# Altium PCB PWR Board 10A.PcbDoc (part 9 of 10)
Units mm, origin at the board's own origin, x right, y up, seen from the top; angles counter-clockwise.
Board outline 355 x 325 mm, 4 copper layers (Top Layer, Layer 1, Layer 2, Bottom Layer), stack 1.636 mm thick; 617 components, 308 nets, 1518 pads, 1199 vias.
Unrouted connection lines stored in the file: 361.
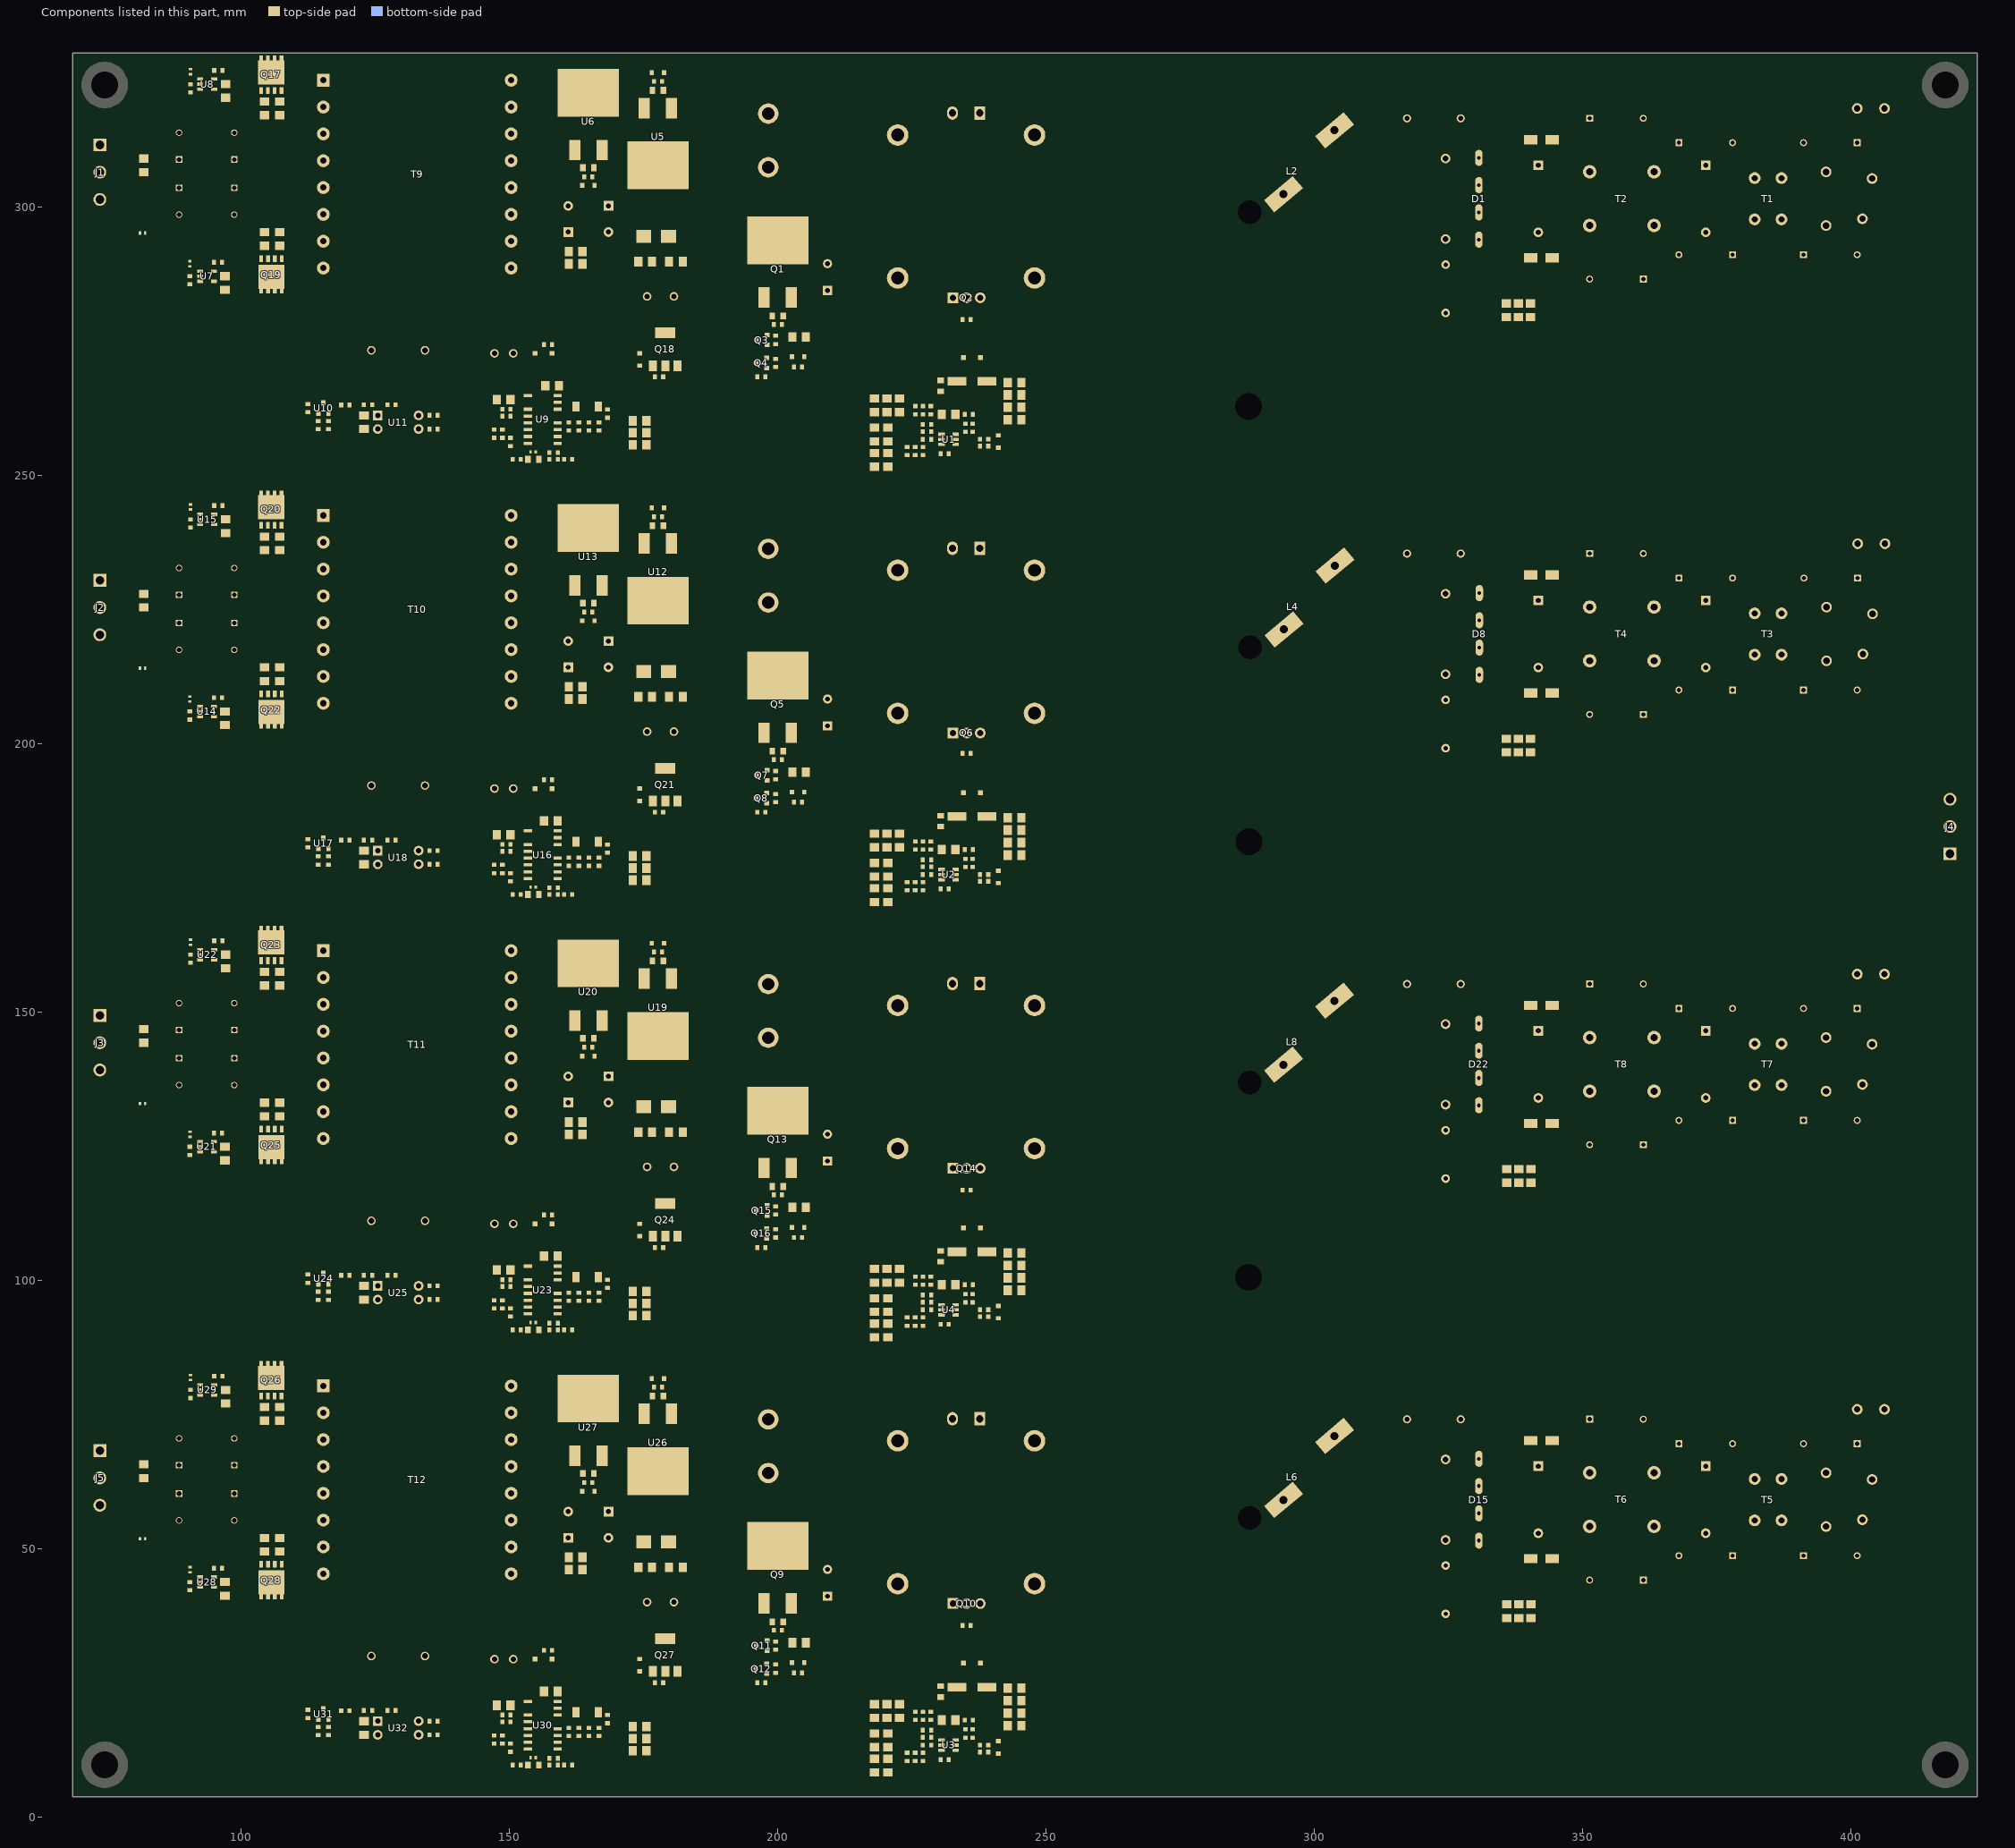
[diagram p7: the components of this part, seen from the top]

## Other copper
Top Layer:
  rectangle net NetD29_2: 178.105,314.757 181.304,325.781
  rectangle net H_V-C1: 207.442,301.523 219.202,325.781
  rectangle net VD-C1: 225.298,313.182 234.823,325.781
  rectangle net VD-C1: 225.298,319.557 269.164,325.781
  rectangle net NetD35_2: 178.105,233.654 181.304,244.678
  rectangle net H_V-C2: 207.442,220.421 219.202,244.678
  rectangle net VD-C2: 225.298,232.08 234.823,244.678
  rectangle net VD-C2: 225.298,238.455 269.164,244.678
  rectangle net NetD47_2: 178.105,71.45 181.304,82.474
  rectangle net H_V-C4: 207.442,58.216 219.202,82.474
  rectangle net VD-C4: 225.298,69.875 234.823,82.474
  rectangle net VD-C4: 225.298,76.25 269.164,82.474
  rectangle net VD-C3: 225.298,157.353 269.164,163.576
  rectangle net VD-C3: 225.298,150.978 234.823,163.576
  region net NetD48_1: 177.668,53.924 170.84,53.924 170.84,49.072 177.668,49.072
  rectangle net SGND-C4: 86.856,69.886 90.145,71.086
  rectangle net SGND-C4: 97.128,69.886 100.417,71.086
  rectangle net SGND-C4: 81.915,41.757 82.372,57.734
  region net PGND-C4: 81.432,57.734 80.975,57.734 80.975,41.757 81.432,41.757
  rectangle net SGND-C1: 81.915,285.064 82.372,301.041
  region net PGND-C1: 81.432,301.041 80.975,301.041 80.975,285.064 81.432,285.064
  rectangle net SGND-C2: 81.915,203.962 82.372,219.939
  region net PGND-C2: 81.432,219.939 80.975,219.939 80.975,203.962 81.432,203.962
  region net PGND-C3: 81.432,138.836 80.975,138.836 80.975,122.86 81.432,122.86
  rectangle net SGND-C3: 81.915,122.86 82.372,138.836
  rectangle net NetC63_1: 204.216,22.758 212.344,33.322
  rectangle net NetC86_1: 204.216,103.86 212.344,114.424
  rectangle net NetC40_1: 204.216,184.963 212.344,195.527
  rectangle net H_V-C4: 207.442,58.216 245.186,67.487
  rectangle net H_V-C4: 235.661,58.216 245.186,75.539
  rectangle net VD-C3: 225.298,150.978 234.823,163.576
  rectangle net H_V-C3: 207.442,139.319 245.186,148.59
  rectangle net H_V-C3: 235.661,139.319 245.186,156.642
  rectangle net H_V-C2: 207.442,220.421 245.186,229.692
  rectangle net H_V-C2: 235.661,220.421 245.186,237.744
  rectangle net NetC6_1: 385.47,303.301 405.689,309.18
  rectangle net NetC6_1: 397.764,303.403 403.28,319.913
  rectangle net VCC-C4: 157.513,28.919 162.204,31.517
  rectangle net VCC-C3: 157.513,110.021 162.204,112.619
  rectangle net VCC-C2: 157.513,191.13 162.204,193.728
  rectangle net GND: 232.579,254.431 237.016,256.019
  rectangle net GND: 231.268,253.4 232.598,255.144
  rectangle net GND: 232.579,173.329 237.016,174.917
  rectangle net GND: 231.268,172.298 232.598,174.041
  rectangle net GND: 232.579,92.226 237.016,93.814
  rectangle net GND: 231.268,91.196 232.598,92.939
  rectangle net GND: 231.268,10.093 232.598,11.837
  rectangle net GND: 232.579,11.124 237.016,12.712
  rectangle net NetR209_2: 335.026,33.486 336.804,37.79
  rectangle net NetR119_2: 334.924,275.89 336.702,280.194
  rectangle net NetR149_2: 334.924,194.788 336.702,199.092
  rectangle net AC_N: 385.089,51.385 423.266,59.983
  rectangle net AC_N: 385.089,132.487 423.266,141.085
  rectangle net AC_N: 385.089,212.687 423.266,221.285
  rectangle net AC_N: 385.089,293.789 423.266,302.387
  rectangle net GND: 142.977,229.082 152.045,234.061
  rectangle net GND: 142.977,226.161 148.692,234.061
  rectangle net NetD50_1: 173.858,22.758 177.559,28.081
  region net VCC-C4: 193.675,28.081 180.607,28.081 180.607,24.53 193.675,24.53
  rectangle net VCC-C4: 180.607,22.758 196.624,26.638
  rectangle net NetD44_1: 173.858,103.86 177.559,109.183
  region net VCC-C3: 193.675,109.183 180.607,109.183 180.607,105.633 193.675,105.633
  rectangle net VCC-C3: 180.607,103.86 196.624,107.74
  rectangle net NetD38_1: 173.858,184.963 177.559,190.286
  region net VCC-C2: 193.675,190.286 180.607,190.286 180.607,186.735 193.675,186.735
  rectangle net VCC-C2: 180.607,184.963 196.624,188.842
  rectangle net VD-C4: 216.179,14.503 222.453,17.081
  rectangle net VD-C3: 216.179,95.605 222.453,98.183
  rectangle net VD-C2: 216.179,176.708 222.453,179.285
  rectangle net NetD19_2: 238.732,12.907 241.589,16.072
  rectangle net NetD19_1: 238.732,11.357 241.589,12.501
  rectangle net NetD26_2: 238.732,94.01 241.589,97.175
  rectangle net NetD26_1: 238.732,92.46 241.589,93.603
  rectangle net NetD12_2: 238.732,175.112 241.589,178.277
  rectangle net NetD12_1: 238.732,173.562 241.589,174.706
  rectangle net H_V-C1: 235.661,301.523 245.186,318.846
  rectangle net H_V-C1: 207.442,301.523 245.186,310.794
  rectangle net NetD30_2: 178.285,292.379 192.659,297.231
  rectangle net NetD30_2: 181.575,288.881 192.659,297.231
  rectangle net NetD36_2: 178.285,211.277 192.659,216.128
  rectangle net NetD36_2: 181.575,207.779 192.659,216.128
  rectangle net NetD42_2: 178.285,130.175 192.659,135.026
  rectangle net NetD42_2: 181.575,126.677 192.659,135.026
  rectangle net NetC4_2: 320.65,287.971 333.019,295.439
  rectangle net NetC2_2: 361.036,293.815 384.073,300.978
  rectangle net NetC2_2: 361.036,289.597 370.764,300.952
  rectangle net NetC7_1: 361.036,302.018 384.073,309.18
  rectangle net NetC7_1: 361.036,302.043 370.764,313.398
  rectangle net VD_R1-C1: 101.194,279.629 121.666,289.428
  rectangle net VD_R1-C2: 101.194,198.527 121.666,208.325
  rectangle net VD_R1-C3: 101.194,117.424 121.666,127.223
  rectangle net GND: 142.977,66.878 152.045,71.856
  rectangle net GND: 142.977,63.957 148.692,71.856
  rectangle net GND: 142.977,147.98 152.045,152.959
  rectangle net GND: 142.977,145.059 148.692,152.959
  rectangle net GND: 142.977,307.264 148.692,315.163
  rectangle net GND: 142.977,310.185 152.045,315.163
  rectangle net NetR144_2: 94.481,242.389 95.581,244.749
  rectangle net RVCC-C4: 236.804,27.533 240.787,29.667
  rectangle net RVCC-C3: 236.804,108.636 240.787,110.769
  rectangle net RVCC-C2: 236.804,189.738 240.787,191.871
  rectangle net H_V-C4: 174.803,15.915 176.327,21.971
  region net H_V-C4: 218.98,21.971 174.803,21.971 174.803,20.205 218.98,20.205
  region net RVCC-C4: 170.231,23.26 168.504,23.26 168.504,22.498 170.231,22.498
  region net RVCC-C4: 169.469,23.26 169.469,16.11 170.231,16.11 170.231,23.26
  rectangle net RVCC-C4: 158.261,16.11 170.231,16.872
  rectangle net RVCC-C4: 167.881,16.11 168.77,17.761
  region net NetR209_2: 155.482,17.556 155.482,21.795 154.882,21.795 154.882,17.556
  rectangle net NetR209_2: 152.711,21.195 155.482,21.795
  rectangle net NetD51_2: 165.974,18.513 168.77,20.413
  rectangle net VCC-C4: 157.513,28.919 158.463,31.517
  rectangle net NetR211_1: 172.263,13.667 173.787,17.693
  rectangle net NetR212_1: 174.803,11.419 176.327,15.445
  rectangle net HB-C4: 155.972,18.655 163.154,19.465
  rectangle net HB-C4: 155.972,18.655 157.496,24.233
  rectangle net HS-C4: 158.261,21.195 160.036,27.076
  rectangle net NetC229_2: 158.261,8.998 160.604,10.261
  rectangle net NetC229_2: 158.261,8.998 159.811,12.905
  rectangle net BW-C4: 151.765,8.998 154.261,10.268
  rectangle net BW-C4: 152.711,8.998 154.261,12.905
  rectangle net NetC223_1: 149.475,28.524 155.372,30.169
  rectangle net NetC223_1: 149.475,19.869 150.999,30.169
  rectangle net H_V-C3: 174.803,97.017 176.327,103.073
  region net H_V-C3: 218.98,103.073 174.803,103.073 174.803,101.307 218.98,101.307
  region net RVCC-C3: 170.231,104.362 168.504,104.362 168.504,103.6 170.231,103.6
  region net RVCC-C3: 169.469,104.362 169.469,97.213 170.231,97.213 170.231,104.362
  rectangle net RVCC-C3: 158.261,97.213 170.231,97.975
  rectangle net RVCC-C3: 167.881,97.213 168.77,98.864
  region net NetR179_2: 155.482,98.658 155.482,102.897 154.882,102.897 154.882,98.658
  rectangle net NetR179_2: 152.711,102.297 155.482,102.897
  rectangle net NetD45_2: 165.974,99.615 168.77,101.515
  rectangle net VCC-C3: 157.513,110.021 158.463,112.619
  rectangle net NetR181_1: 172.263,94.769 173.787,98.795
  rectangle net NetR182_1: 174.803,92.521 176.327,96.547
  rectangle net HB-C3: 155.972,99.757 163.154,100.567
  rectangle net HB-C3: 155.972,99.757 157.496,105.335
  rectangle net HS-C3: 158.261,102.297 160.036,108.178
  rectangle net NetC194_2: 158.261,90.101 160.604,91.364
  rectangle net NetC194_2: 158.261,90.101 159.811,94.007
  rectangle net BW-C3: 151.765,90.101 154.261,91.371
  rectangle net BW-C3: 152.711,90.101 154.261,94.007
  rectangle net NetC188_1: 149.475,109.626 155.372,111.271
  rectangle net NetC188_1: 149.475,100.972 150.999,111.271
  rectangle net NetC153_1: 149.475,182.074 150.999,192.374
  rectangle net NetC153_1: 149.475,190.728 155.372,192.374
  rectangle net BW-C2: 152.711,171.203 154.261,175.11
  rectangle net BW-C2: 151.765,171.203 154.261,172.473
  rectangle net NetC159_2: 158.261,171.203 159.811,175.11
  rectangle net NetC159_2: 158.261,171.203 160.604,172.466
  rectangle net HS-C2: 158.261,183.4 160.036,189.281
  rectangle net HB-C2: 155.972,180.86 157.496,186.437
  rectangle net HB-C2: 155.972,180.86 163.154,181.67
  rectangle net NetR152_1: 174.803,173.624 176.327,177.65
  rectangle net NetR151_1: 172.263,175.872 173.787,179.897
  rectangle net VCC-C2: 157.513,191.124 158.463,193.722
  rectangle net NetD39_2: 165.974,180.718 168.77,182.618
  rectangle net NetR149_2: 152.711,183.4 155.482,184
  region net NetR149_2: 155.482,179.76 155.482,184 154.882,184 154.882,179.76
  rectangle net RVCC-C2: 167.881,178.315 168.77,179.966
  rectangle net RVCC-C2: 158.261,178.315 170.231,179.077
  region net RVCC-C2: 169.469,185.465 169.469,178.315 170.231,178.315 170.231,185.465
  region net RVCC-C2: 170.231,185.465 168.504,185.465 168.504,184.703 170.231,184.703
  region net H_V-C2: 218.98,184.175 174.803,184.175 174.803,182.409 218.98,182.409
  rectangle net H_V-C2: 174.803,178.119 176.327,184.175
  rectangle net 24VDC-C4: 94.423,40.429 95.523,43.081
  rectangle net 24VDC-C3: 94.425,121.546 95.525,124.198
  rectangle net 24VDC-C4: 94.425,28.194 97.917,41.967
  region net 24VDC-C4: 125.781,28.194 125.781,31.685 94.425,31.685 94.425,28.194
  rectangle net 24VDC-C3: 94.425,109.296 97.917,123.07
  region net 24VDC-C3: 125.781,109.296 125.781,112.788 94.425,112.788 94.425,109.296
  rectangle net 24VDC-C2: 94.425,190.398 97.917,204.172
  region net 24VDC-C2: 125.781,190.398 125.781,193.89 94.425,193.89 94.425,190.398
  rectangle net H_V-C1: 174.803,259.222 176.327,265.278
  region net 24VDC-C1: 125.781,271.501 125.781,274.992 94.425,274.992 94.425,271.501
  rectangle net 24VDC-C2: 94.425,202.648 97.917,204.172
  rectangle net 24VDC-C2: 94.425,202.648 95.525,205.3
  rectangle net 24VDC-C1: 94.425,283.75 95.525,286.402
  rectangle net 24VDC-C1: 94.425,283.75 97.917,285.274
  region net H_V-C1: 218.98,265.278 174.803,265.278 174.803,263.512 218.98,263.512
  region net RVCC-C1: 170.231,266.567 168.504,266.567 168.504,265.805 170.231,265.805
  rectangle net RVCC-C1: 236.804,270.84 240.787,272.974
  region net RVCC-C1: 169.469,266.567 169.469,259.417 170.231,259.417 170.231,266.567
  rectangle net RVCC-C1: 158.261,259.417 170.231,260.179
  rectangle net RVCC-C1: 167.881,259.417 168.77,261.068
  rectangle net NetR204_2: 94.481,80.184 95.581,82.544
  rectangle net 24VDC-C4: 94.481,72.186 98.019,77.756
  region net NetR221_2: 127.686,21.183 127.686,21.945 122.047,21.945 122.047,21.183
  rectangle net NetR221_2: 126.924,19.343 127.686,21.945
  rectangle net NetR221_2: 122.047,17.049 123.317,21.945
  rectangle net NetR221_2: 119.837,19.343 123.317,20.232
  rectangle net VD_R2-C4: 96.174,81.655 102.997,84.905
  rectangle net NetR204_2: 94.481,80.184 95.581,82.544
  rectangle net 24VDC-C4: 94.481,72.186 95.581,78.884
  rectangle net 24VDC-C4: 96.241,72.186 102.464,74.505
  region net SGND-C4: 108.712,77.125 98.328,77.125 98.328,75.057 108.712,75.057
  region net SGND-C4: 106.651,78.989 98.328,78.989 98.328,75.057 106.651,75.057
  rectangle net SGND-C4: 104.704,46.396 108.915,50.172
  rectangle net VD_R1-C4: 109.601,40.641 121.666,51.988
  rectangle net VD_R1-C4: 101.194,36.322 121.666,46.12
  rectangle net VD_R2-C4: 101.194,79.327 121.666,84.905
  rectangle net VD_R2-C4: 109.601,73.558 121.666,84.905
  rectangle net NetD48_2: 181.575,45.574 192.659,53.924
  rectangle net NetD48_2: 178.285,49.072 192.659,53.924
  region net LO-C4: 166.305,62.718 165.136,62.718 165.136,60.198 166.305,60.198
  rectangle net GND: 165.136,63.315 168.335,70.231
  region net NetD49_2: 164.374,70.231 161.175,70.231 161.175,60.198 164.374,60.198
  region net HS-C4: 177.343,79.001 159.04,79.001 159.04,71.45 177.343,71.45
  rectangle net HO-C4: 176.174,79.597 177.343,82.118
  rectangle net NetC63_1: 204.216,26.381 206.07,33.322
  rectangle net NetQ12_1: 197.386,24.53 203.454,27.27
  rectangle net NetQ11_1: 197.512,29.641 200.115,31.7
  rectangle net NetQ11_1: 194.337,29.641 200.115,31.112
  rectangle net NetQ11_1: 194.337,27.178 196.465,31.112
  rectangle net RVCC-C4: 200.713,29.641 203.53,33.322
  rectangle net NetC59_2: 194.337,31.464 196.774,44.018
  rectangle net NetQ11_1: 197.512,30.427 200.115,31.493
  rectangle net RVCC-C4: 197.512,32.122 203.53,33.322
  rectangle net NetC59_2: 194.337,34.326 199.671,44.018
  rectangle net NetC58_2: 194.337,44.627 212.344,56.819
  rectangle net NetC58_2: 194.337,44.627 205.767,70.078
  rectangle net NetR203_2: 94.425,44.395 95.525,46.755
  rectangle net GND: 225.251,19.163 228.996,21.971
  rectangle net NetC61_1: 223.713,7.213 227.549,10.781
  rectangle net NetD19_2: 230.734,34.671 234.861,36.626
  rectangle net NetD19_2: 230.734,34.671 233.702,41.148
  rectangle net DRV-C4: 237.38,11.632 238.142,13.817
  rectangle net DRV-C4: 232.579,13.042 238.142,13.662
  rectangle net NetC64_2: 232.579,14.363 236.8,15.125
  rectangle net NetC65_1: 235.911,15.887 236.8,18.465
  rectangle net NetC64_2: 232.579,13.992 233.799,15.125
  rectangle net ZCD/CS-C4: 228.247,10.019 230.762,11.328
  rectangle net ZCD/CS-C4: 227.866,10.019 229.413,13.796
  rectangle net ZCD/CS-C4: 228.247,13.042 231.179,13.662
  rectangle net NetC68_2: 227.866,14.35 231.179,15.125
  rectangle net NetC68_2: 229.959,13.943 231.179,15.125
  rectangle net NetC68_2: 227.866,14.35 229.194,18.401
  rectangle net NetC68_2: 225.251,17.005 229.194,18.401
  rectangle net NetR58_1: 223.063,14.35 224.663,19.189
  rectangle net NetR58_1: 221.825,17.381 224.663,19.189
  rectangle net NetR58_1: 223.063,14.35 227.485,16.56
  rectangle net NetC60_1: 219.666,11.543 227.549,13.735
  rectangle net NetR55_1: 219.513,20.205 223.603,21.971
  rectangle net NetR53_1: 216.179,17.381 221.291,19.189
  rectangle net NetR59_1: 216.179,7.213 222.467,9.519
  region net NetC60_1: 222.467,13.735 219.666,13.735 219.666,10.027 222.467,10.027
  rectangle net NetR56_1: 216.179,10.027 218.98,13.735
  rectangle net NetC66_2: 229.796,17.131 231.879,22.805
  rectangle net NetC67_1: 229.796,23.367 235.839,29.667
  rectangle net NetC90_1: 229.796,104.469 235.839,110.769
  rectangle net NetC89_2: 229.796,98.234 231.879,103.907
  rectangle net NetR82_1: 216.179,91.129 218.98,94.838
  region net NetC83_1: 222.467,94.838 219.666,94.838 219.666,91.129 222.467,91.129
  rectangle net NetR85_1: 216.179,88.316 222.467,90.621
  rectangle net NetR79_1: 216.179,98.484 221.291,100.291
  rectangle net NetR81_1: 219.513,101.307 223.603,103.073
  rectangle net NetC83_1: 219.666,92.646 227.549,94.838
  rectangle net NetR84_1: 223.063,95.452 227.485,97.662
  rectangle net NetR84_1: 221.825,98.484 224.663,100.291
  rectangle net NetR84_1: 223.063,95.452 224.663,100.291
  rectangle net NetC91_2: 225.251,98.108 229.194,99.504
  rectangle net NetC91_2: 227.866,95.452 229.194,99.504
  rectangle net NetC91_2: 229.959,95.045 231.179,96.227
  rectangle net NetC91_2: 227.866,95.452 231.179,96.227
  rectangle net ZCD/CS-C3: 228.247,94.144 231.179,94.764
  rectangle net ZCD/CS-C3: 227.866,91.122 229.413,94.899
  rectangle net ZCD/CS-C3: 228.247,91.122 230.762,92.43
  rectangle net NetC87_2: 232.579,95.094 233.799,96.227
  rectangle net NetC88_1: 235.911,96.989 236.8,99.567
  rectangle net NetC87_2: 232.579,95.465 236.8,96.227
  rectangle net DRV-C3: 232.579,94.144 238.142,94.764
  rectangle net DRV-C3: 237.38,92.734 238.142,94.919
  rectangle net NetD26_2: 230.734,115.773 233.702,122.25
  rectangle net NetD26_2: 230.734,115.773 234.861,117.729
  rectangle net NetC84_1: 223.713,88.316 227.549,91.884
  rectangle net GND: 225.251,100.266 228.996,103.073
  rectangle net NetC44_1: 229.796,185.572 235.839,191.871
  rectangle net NetC43_2: 229.796,179.336 231.879,185.009
  rectangle net NetR30_1: 216.179,172.232 218.98,175.94
  region net NetC37_1: 222.467,175.94 219.666,175.94 219.666,172.232 222.467,172.232
  rectangle net NetR33_1: 216.179,169.418 222.467,171.724
  rectangle net NetR27_1: 216.179,179.586 221.291,181.393
  rectangle net NetR29_1: 219.513,182.409 223.603,184.175
  rectangle net NetC37_1: 219.666,173.748 227.549,175.94
  rectangle net NetR32_1: 223.063,176.555 227.485,178.764
  rectangle net NetR32_1: 221.825,179.586 224.663,181.393
  rectangle net NetR32_1: 223.063,176.555 224.663,181.393
  rectangle net NetC45_2: 225.251,179.21 229.194,180.606
  rectangle net NetC45_2: 227.866,176.555 229.194,180.606
  rectangle net NetC45_2: 229.959,176.148 231.179,177.329
  rectangle net NetC45_2: 227.866,176.555 231.179,177.329
  rectangle net ZCD/CS-C2: 228.247,175.247 231.179,175.867
  rectangle net ZCD/CS-C2: 227.866,172.224 229.413,176.001
  rectangle net ZCD/CS-C2: 228.247,172.224 230.762,173.533
  rectangle net NetC41_2: 232.579,176.197 233.799,177.329
  rectangle net NetC42_1: 235.911,178.091 236.8,180.669
  rectangle net NetC41_2: 232.579,176.567 236.8,177.329
  rectangle net DRV-C2: 232.579,175.247 238.142,175.867
  rectangle net DRV-C2: 237.38,173.837 238.142,176.021
  rectangle net NetD12_2: 230.734,196.875 233.702,203.352
  rectangle net NetD12_2: 230.734,196.875 234.861,198.831
  rectangle net NetC38_1: 223.713,169.418 227.549,172.986
  rectangle net GND: 225.251,181.368 228.996,184.175
  rectangle net NetR208_2: 335.001,38.806 339.026,40.33
  rectangle net NetR207_2: 337.248,36.266 341.274,37.79
  rectangle net HV_S-C4: 339.496,38.806 341.274,43.448
  rectangle net HV_S-C4: 335.519,67.577 342.123,76.188
  rectangle net HV_S-C4: 335.519,41.999 342.123,50.584
  rectangle net NetR179_2: 335.026,114.588 336.804,118.893
  rectangle net HV_S-C3: 335.519,123.101 342.123,131.686
  rectangle net HV_S-C3: 335.519,148.679 342.123,157.29
  rectangle net HV_S-C3: 339.496,119.909 341.274,124.55
  rectangle net NetR177_2: 337.259,117.368 341.285,118.892
  rectangle net NetR178_2: 335.011,119.908 339.037,121.432
  rectangle net NetR173_2: 94.425,125.498 95.525,127.858
  rectangle net H_V-C3: 207.442,139.319 219.202,163.576
  rectangle net NetC81_2: 194.337,125.73 205.767,151.181
  rectangle net NetC81_2: 194.337,125.73 212.344,137.922
  rectangle net NetC82_2: 194.337,115.428 199.671,125.12
  rectangle net RVCC-C3: 197.512,113.224 203.53,114.424
  rectangle net NetQ15_1: 197.512,111.529 200.115,112.596
  rectangle net NetC82_2: 194.337,112.567 196.774,125.12
  rectangle net RVCC-C3: 200.713,110.744 203.53,114.424
  rectangle net NetQ15_1: 194.337,108.28 196.465,112.215
  rectangle net NetQ15_1: 194.337,110.744 200.115,112.215
  rectangle net NetQ15_1: 197.512,110.744 200.115,112.802
  rectangle net NetQ16_1: 197.386,105.633 203.454,108.372
  rectangle net NetC86_1: 204.216,107.483 206.07,114.424
  rectangle net NetD41_2: 178.105,152.552 181.304,163.576
  rectangle net HO-C3: 176.174,160.7 177.343,163.22
  rectangle net HS-C3: 159.04,152.552 174.828,163.576
  region net HS-C3: 177.343,160.103 159.04,160.103 159.04,152.552 177.343,152.552
  region net NetD43_2: 164.374,151.333 161.175,151.333 161.175,141.3 164.374,141.3
  rectangle net GND: 165.136,144.417 168.335,151.333
  region net LO-C3: 166.305,143.821 165.136,143.821 165.136,141.3 166.305,141.3
  region net NetD42_1: 177.668,135.026 170.84,135.026 170.84,130.175 177.668,130.175
  rectangle net VD_R2-C3: 109.601,154.66 121.666,166.007
  rectangle net VD_R2-C3: 101.194,160.429 121.666,166.007
  rectangle net VD_R1-C3: 109.601,121.744 121.666,133.09
  rectangle net SGND-C3: 104.704,127.498 108.915,131.274
  region net SGND-C3: 106.651,160.142 98.328,160.142 98.328,156.159 106.651,156.159
  region net SGND-C3: 108.712,158.228 98.328,158.228 98.328,156.159 108.712,156.159
  rectangle net 24VDC-C3: 96.241,153.289 102.464,155.607
  rectangle net 24VDC-C3: 94.481,153.289 95.581,159.986
  rectangle net NetR174_2: 94.481,161.286 95.581,163.646
  rectangle net VD_R2-C3: 96.174,162.757 102.997,166.007
  rectangle net NetR191_2: 119.837,100.446 123.317,101.335
  rectangle net NetR191_2: 122.047,98.152 123.317,103.047
  rectangle net NetR191_2: 126.924,100.446 127.686,103.047
  region net NetR191_2: 127.686,102.285 127.686,103.047 122.047,103.047 122.047,102.285
  rectangle net 24VDC-C3: 94.481,153.289 98.019,158.858
  rectangle net SGND-C3: 86.856,150.988 90.145,152.188
  rectangle net SGND-C3: 97.128,150.988 100.417,152.188
  rectangle net NetC25_2: 361.123,212.687 384.16,219.849
  rectangle net NetC30_1: 361.123,220.915 384.16,228.077
  rectangle net NetC31_1: 336.84,220.801 353.909,227.863
  rectangle net NetC31_1: 342.657,220.801 353.909,237.489
  rectangle net NetC31_1: 329.601,220.801 353.909,225.069
  rectangle net NetC26_2: 336.84,212.927 353.909,219.988
  rectangle net NetC26_2: 342.657,203.3 353.909,219.988
  rectangle net NetC26_2: 329.601,215.721 353.909,219.988
  rectangle net NetC25_2: 361.123,208.494 370.851,219.849
  rectangle net NetC30_1: 361.123,220.94 370.851,232.295
  rectangle net NetC27_2: 320.737,206.868 333.106,214.336
  rectangle net NetC28_2: 309.23,197.967 326.934,205.892
  rectangle net NetC28_2: 308.443,197.967 319.289,237.515
  rectangle net NetC28_2: 298.308,225.475 319.289,237.515
  rectangle net NetR148_2: 335.011,200.107 339.037,201.631
  rectangle net NetR147_2: 337.259,197.567 341.285,199.091
  rectangle net HV_S-C2: 335.519,228.879 342.123,237.489
  rectangle net HV_S-C2: 335.519,203.3 342.123,211.885
  rectangle net HV_S-C2: 339.507,200.107 341.285,204.749
  rectangle net NetC35_2: 194.337,206.832 205.767,232.283
  rectangle net NetC35_2: 194.337,206.832 212.344,219.024
  rectangle net NetC36_2: 194.337,196.53 199.671,206.222
  rectangle net RVCC-C2: 197.512,194.326 203.53,195.527
  rectangle net NetQ7_1: 197.512,192.631 200.115,193.698
  rectangle net NetC36_2: 194.337,193.669 196.774,206.222
  rectangle net RVCC-C2: 200.713,191.846 203.53,195.527
  rectangle net NetQ7_1: 194.337,189.382 196.465,193.317
  rectangle net NetQ7_1: 194.337,191.846 200.115,193.317
  rectangle net NetQ7_1: 197.512,191.846 200.115,193.904
  rectangle net NetQ8_1: 197.386,186.735 203.454,189.475
  rectangle net NetC40_1: 204.216,188.586 206.07,195.527
  rectangle net HO-C2: 176.174,241.802 177.343,244.322
  region net HS-C2: 177.343,241.205 159.04,241.205 159.04,233.654 177.343,233.654
  region net NetD37_2: 164.374,232.435 161.175,232.435 161.175,222.403 164.374,222.403
  rectangle net GND: 165.136,225.52 168.335,232.435
  region net LO-C2: 166.305,224.923 165.136,224.923 165.136,222.403 166.305,222.403
  region net NetD36_1: 177.668,216.128 170.84,216.128 170.84,211.277 177.668,211.277
  rectangle net VD_R2-C2: 109.601,235.763 121.666,247.109
  rectangle net VD_R2-C2: 101.194,241.531 121.666,247.109
  rectangle net VD_R1-C2: 109.601,202.846 121.666,214.193
  rectangle net SGND-C2: 104.704,208.601 108.915,212.376
  region net SGND-C2: 106.651,241.244 98.328,241.244 98.328,237.268 106.651,237.268
  region net SGND-C2: 108.712,239.33 98.328,239.33 98.328,237.261 108.712,237.261
  rectangle net 24VDC-C2: 96.241,234.391 102.464,236.709
  rectangle net 24VDC-C2: 94.481,234.391 95.581,241.089
  rectangle net VD_R2-C2: 96.174,243.86 102.997,247.109
  rectangle net NetR143_2: 94.425,206.6 95.525,208.96
  rectangle net NetR161_2: 119.837,181.548 123.317,182.437
  rectangle net NetR161_2: 122.047,179.254 123.317,184.15
  rectangle net NetR161_2: 126.924,181.548 127.686,184.15
  region net NetR161_2: 127.686,183.388 127.686,184.15 122.047,184.15 122.047,183.388
  rectangle net 24VDC-C2: 94.481,234.391 98.019,239.961
  rectangle net SGND-C2: 86.856,232.09 90.145,233.29
  rectangle net SGND-C2: 97.128,232.09 100.417,233.29
  region net NetR119_2: 155.482,260.863 155.482,265.102 154.882,265.102 154.882,260.863
  rectangle net NetR119_2: 152.711,264.502 155.482,265.102
  rectangle net NetD33_2: 165.974,261.82 168.77,263.72
  rectangle net HV_S-C1: 339.42,281.21 341.198,285.852
  rectangle net HV_S-C1: 335.432,284.403 342.036,292.988
  rectangle net HV_S-C1: 335.432,309.982 342.036,318.592
  rectangle net SGND-C1: 97.128,313.193 100.417,314.393
  rectangle net SGND-C1: 86.856,313.193 90.145,314.393
  rectangle net 24VDC-C1: 94.481,315.493 98.019,321.063
  rectangle net 24VDC-C1: 94.425,271.501 97.917,285.274
  rectangle net VCC-C1: 157.513,272.226 162.204,274.824
  region net NetR131_2: 127.686,264.49 127.686,265.252 122.047,265.252 122.047,264.49
  rectangle net NetR131_2: 126.924,262.651 127.686,265.252
  rectangle net NetR131_2: 122.047,260.357 123.317,265.252
  rectangle net NetR131_2: 119.837,262.651 123.317,263.54
  rectangle net NetR121_1: 172.263,256.974 173.787,261
  rectangle net NetR122_1: 174.803,254.726 176.327,258.752
  rectangle net HB-C1: 155.972,261.962 163.154,262.772
  rectangle net HB-C1: 155.972,261.962 157.496,267.54
  rectangle net HS-C1: 158.261,264.502 160.036,270.383
  rectangle net NetC124_2: 158.261,252.305 160.604,253.568
  rectangle net NetC124_2: 158.261,252.305 159.811,256.212
  rectangle net BW-C1: 151.765,252.305 154.261,253.575
  rectangle net BW-C1: 152.711,252.305 154.261,256.212
  rectangle net NetC118_1: 149.475,271.831 155.372,273.476
  rectangle net NetC118_1: 149.475,263.176 150.999,273.476
  rectangle net NetR117_2: 337.172,278.67 341.198,280.194
  rectangle net NetR118_2: 334.924,281.21 338.95,282.734
  rectangle net NetR204_2: 94.481,80.184 95.581,82.544
  rectangle net NetR174_2: 94.481,161.286 95.581,163.646
  rectangle net NetR144_2: 94.481,242.389 95.581,244.749
  rectangle net NetR113_2: 94.425,287.702 95.525,290.062
  rectangle net VD_R2-C1: 96.174,324.962 102.997,328.212
  rectangle net NetR114_2: 94.481,323.491 95.581,325.851
  rectangle net 24VDC-C1: 94.481,315.493 95.581,322.191
  rectangle net 24VDC-C1: 96.241,315.493 102.464,317.812
  region net SGND-C1: 108.712,320.432 98.328,320.432 98.328,318.364 108.712,318.364
  region net SGND-C1: 106.651,322.296 98.328,322.296 98.328,318.364 106.651,318.364
  rectangle net SGND-C1: 104.704,289.703 108.915,293.479
  rectangle net VD_R1-C1: 109.601,283.948 121.666,295.295
  rectangle net VD_R2-C1: 101.194,322.634 121.666,328.212
  rectangle net VD_R2-C1: 109.601,316.865 121.666,328.212
  region net NetD30_1: 177.668,297.231 170.84,297.231 170.84,292.379 177.668,292.379
  rectangle net VCC-C1: 180.607,266.065 196.624,269.945
  region net VCC-C1: 193.675,271.388 180.607,271.388 180.607,267.837 193.675,267.837
  rectangle net NetD32_1: 173.858,266.065 177.559,271.388
  region net LO-C1: 166.305,306.025 165.136,306.025 165.136,303.505 166.305,303.505
  rectangle net GND: 165.136,306.622 168.335,313.538
  region net NetD31_2: 164.374,313.538 161.175,313.538 161.175,303.505 164.374,303.505
  region net HS-C1: 177.343,322.308 159.04,322.308 159.04,314.757 177.343,314.757
  rectangle net HO-C1: 176.174,322.905 177.343,325.425
  rectangle net NetC17_1: 204.216,266.065 212.344,276.629
  rectangle net NetQ4_1: 197.386,266.065 203.454,270.577
  rectangle net NetQ3_1: 197.512,272.948 200.115,275.007
  rectangle net NetQ3_1: 194.337,272.948 200.115,274.419
  rectangle net NetQ3_1: 194.337,270.485 196.465,274.419
  rectangle net RVCC-C1: 200.713,272.948 203.53,276.629
  rectangle net NetC13_2: 194.337,274.771 196.774,287.325
  rectangle net NetQ3_1: 197.512,273.734 200.115,274.8
  rectangle net RVCC-C1: 197.512,275.429 203.53,276.629
  rectangle net NetC13_2: 194.337,277.633 199.671,287.325
  rectangle net NetC12_2: 194.337,287.934 212.344,300.126
  rectangle net NetC12_2: 194.337,287.934 205.767,313.385
  rectangle net GND: 225.251,262.47 228.996,265.278
  rectangle net NetC15_1: 223.713,250.52 227.549,254.088
  rectangle net NetD5_2: 230.734,277.978 234.861,279.933
  rectangle net NetD5_2: 230.734,277.978 233.702,284.455
  rectangle net DRV-C1: 237.38,254.939 238.142,257.124
  rectangle net DRV-C1: 232.579,256.349 238.142,256.969
  rectangle net NetD5_1: 238.732,254.685 241.589,255.828
  rectangle net NetD5_2: 238.732,256.235 241.589,259.4
  rectangle net NetC18_2: 232.579,257.67 236.8,258.432
  rectangle net NetC19_1: 235.911,259.194 236.8,261.772
  rectangle net NetC18_2: 232.579,257.299 233.799,258.432
  rectangle net ZCD/CS-C1: 228.247,253.326 230.762,254.635
  rectangle net ZCD/CS-C1: 227.866,253.326 229.413,257.103
  rectangle net ZCD/CS-C1: 228.247,256.349 231.179,256.969
  rectangle net NetC22_2: 227.866,257.657 231.179,258.432
  rectangle net NetC22_2: 229.959,257.25 231.179,258.432
  rectangle net NetC22_2: 227.866,257.657 229.194,261.708
  rectangle net NetC22_2: 225.251,260.312 229.194,261.708
  rectangle net NetR6_1: 223.063,257.657 224.663,262.496
  rectangle net NetR6_1: 221.825,260.688 224.663,262.496
  rectangle net NetR6_1: 223.063,257.657 227.485,259.867
  rectangle net NetC14_1: 219.666,254.85 227.549,257.043
  rectangle net NetR3_1: 219.513,263.512 223.603,265.278
  rectangle net NetR1_1: 216.179,260.688 221.291,262.496
  rectangle net NetR7_1: 216.179,250.52 222.467,252.826
  region net NetC14_1: 222.467,257.043 219.666,257.043 219.666,253.334 222.467,253.334
  rectangle net NetR4_1: 216.179,253.334 218.98,257.043
  rectangle net NetC20_2: 229.796,260.438 231.879,266.112
  rectangle net NetC21_1: 229.796,266.674 235.839,272.974
  rectangle net VD-C1: 216.179,257.81 222.453,260.388
  rectangle net NetC5_2: 298.221,306.578 319.202,318.618
  rectangle net NetC5_2: 308.356,279.07 319.202,318.618
  rectangle net NetC5_2: 309.143,279.07 326.847,286.995
  rectangle net NetC74_2: 298.221,144.374 319.202,156.413
  rectangle net NetC74_2: 308.356,116.866 319.202,156.413
  rectangle net NetC74_2: 309.143,116.866 326.847,124.79
  rectangle net NetC51_2: 309.143,35.763 326.847,43.688
  rectangle net NetC51_2: 308.356,35.763 319.202,75.311
  rectangle net NetC51_2: 298.221,63.271 319.202,75.311
  rectangle net NetC50_2: 320.65,45.567 333.019,53.035
  rectangle net NetC73_2: 320.65,126.67 333.019,134.137
  rectangle net NetC76_1: 361.036,140.741 370.764,152.097
  rectangle net NetC71_2: 361.036,128.296 370.764,139.651
  rectangle net NetC53_1: 361.036,59.639 370.764,70.994
  rectangle net NetC48_2: 361.036,47.193 370.764,58.548
  rectangle net NetC3_2: 329.514,296.824 353.822,301.091
  rectangle net NetC3_2: 342.57,284.403 353.822,301.091
  rectangle net NetC3_2: 336.753,294.03 353.822,301.091
  rectangle net NetC49_2: 329.514,54.42 353.822,58.687
  rectangle net NetC49_2: 342.57,41.999 353.822,58.687
  rectangle net NetC49_2: 336.753,51.626 353.822,58.687
  rectangle net NetC72_2: 329.514,135.522 353.822,139.789
  rectangle net NetC72_2: 342.57,123.102 353.822,139.789
  rectangle net NetC72_2: 336.753,132.728 353.822,139.789
  rectangle net NetC54_1: 336.753,59.5 353.822,66.562
  rectangle net NetC54_1: 342.57,59.5 353.822,76.188
  rectangle net NetC54_1: 329.514,59.5 353.822,63.768
  rectangle net NetC77_1: 336.753,140.603 353.822,147.664
  rectangle net NetC77_1: 342.57,140.603 353.822,157.291
  rectangle net NetC77_1: 329.514,140.603 353.822,144.87
  rectangle net NetC8_1: 329.514,301.904 353.822,306.172
  rectangle net NetC8_1: 342.57,301.904 353.822,318.592
  rectangle net NetC8_1: 336.753,301.904 353.822,308.966
  rectangle net NetC53_1: 361.036,59.614 384.073,66.776
  rectangle net NetC48_2: 361.036,51.386 384.073,58.548
  rectangle net NetC71_2: 361.036,132.488 384.073,139.651
  rectangle net NetC76_1: 361.036,140.716 384.073,147.879
  pour cut-out: 229.921,41.666 229.921,34.153 235.623,34.153 235.623,41.666
  pour cut-out: 229.921,41.666 236.652,41.666 236.652,41.148 229.921,41.148
  pour cut-out: 229.921,122.768 229.921,115.255 235.623,115.255 235.623,122.768
  pour cut-out: 229.921,122.768 236.652,122.768 236.652,122.25 229.921,122.25
  pour cut-out: 229.921,284.973 229.921,277.46 235.623,277.46 235.623,284.973
  pour cut-out: 229.921,284.973 236.652,284.973 236.652,284.455 229.921,284.455
  pour cut-out: 229.921,203.87 236.652,203.87 236.652,203.352 229.921,203.352
  pour cut-out: 174.828,326.298 174.828,325.78 183.439,325.78 183.439,326.298
  pour cut-out: 174.828,245.196 174.828,244.678 183.439,244.678 183.439,245.196
  pour cut-out: 174.828,164.094 174.828,163.576 183.439,163.576 183.439,164.094
  pour cut-out: 174.828,82.991 174.828,82.473 183.439,82.473 183.439,82.991
  pour cut-out: 78.544,328.682 cw(c74.617,322.682) 68.618,318.753 68.618,320.082 ccw(c74.617,322.682) 77.214,328.682
  pour cut-out: 78.544,3.682 ccw(c74.617,9.682) 68.618,13.611 68.618,12.282 cw(c74.617,9.682) 77.214,3.682
  pour cut-out: 150.365,78.526 cw(c150.365,80.273) 148.618,80.273 cw(c150.365,80.273) 150.365,82.02 cw(c150.365,80.273) 152.112,80.273 cw(c150.365,80.273)
  pour cut-out: 150.365,73.526 cw(c150.365,75.273) 148.618,75.273 cw(c150.365,75.273) 150.365,77.02 cw(c150.365,75.273) 152.112,75.273 cw(c150.365,75.273)
  pour cut-out: 150.365,154.628 cw(c150.365,156.375) 148.618,156.375 cw(c150.365,156.375) 150.365,158.122 cw(c150.365,156.375) 152.112,156.375 cw(c150.365,156.375)
  pour cut-out: 150.365,159.628 cw(c150.365,161.375) 148.618,161.375 cw(c150.365,161.375) 150.365,163.122 cw(c150.365,161.375) 152.112,161.375 cw(c150.365,161.375)
  pour cut-out: 402.641,224.141 ccw(c404.074,224.141) 404.074,222.709 ccw(c404.074,224.141) 405.507,224.141 ccw(c404.074,224.141) 404.074,225.574 ccw(c404.074,224.141)
  pour cut-out: 394.059,225.383 ccw(c395.492,225.383) 395.492,223.95 ccw(c395.492,225.383) 396.924,225.383 ccw(c395.492,225.383) 395.492,226.816 ccw(c395.492,225.383)
  pour cut-out: 399.869,230.815 ccw(c401.301,230.815) 401.301,229.383 ccw(c401.301,230.815) 402.734,230.815 ccw(c401.301,230.815) 401.301,232.248 ccw(c401.301,230.815)
  pour cut-out: 150.365,235.731 cw(c150.365,237.478) 148.618,237.478 cw(c150.365,237.478) 150.365,239.225 cw(c150.365,237.478) 152.112,237.478 cw(c150.365,237.478)
  pour cut-out: 150.365,240.731 cw(c150.365,242.478) 148.618,242.478 cw(c150.365,242.478) 150.365,244.225 cw(c150.365,242.478) 152.112,242.478 cw(c150.365,242.478)
  pour cut-out: 150.365,321.833 cw(c150.365,323.58) 148.618,323.58 cw(c150.365,323.58) 150.365,325.327 cw(c150.365,323.58) 152.112,323.58 cw(c150.365,323.58)
  pour cut-out: 150.365,316.833 cw(c150.365,318.58) 148.618,318.58 cw(c150.365,318.58) 150.365,320.327 cw(c150.365,318.58) 152.112,318.58 cw(c150.365,318.58)
  pour cut-out: 402.554,62.841 ccw(c403.987,62.841) 403.987,61.408 ccw(c403.987,62.841) 405.42,62.841 ccw(c403.987,62.841) 403.987,64.273 ccw(c403.987,62.841)
  pour cut-out: 393.972,64.082 ccw(c395.405,64.082) 395.405,62.649 ccw(c395.405,64.082) 396.837,64.082 ccw(c395.405,64.082) 395.405,65.515 ccw(c395.405,64.082)
  pour cut-out: 399.782,69.514 ccw(c401.214,69.514) 401.214,68.082 ccw(c401.214,69.514) 402.647,69.514 ccw(c401.214,69.514) 401.214,70.947 ccw(c401.214,69.514)
  pour cut-out: 399.782,150.617 ccw(c401.214,150.617) 401.214,149.184 ccw(c401.214,150.617) 402.647,150.617 ccw(c401.214,150.617) 401.214,152.049 ccw(c401.214,150.617)
  pour cut-out: 393.972,145.185 ccw(c395.405,145.185) 395.405,143.752 ccw(c395.405,145.185) 396.837,145.185 ccw(c395.405,145.185) 395.405,146.617 ccw(c395.405,145.185)
  pour cut-out: 402.554,143.943 ccw(c403.987,143.943) 403.987,142.51 ccw(c403.987,143.943) 405.42,143.943 ccw(c403.987,143.943) 403.987,145.376 ccw(c403.987,143.943)
  region net EARTH: 415.836,3.681 cw(c417.618,9.682) 423.619,11.463 423.618,11.462 423.618,3.682 423.617,3.681
  pour cut-out: 413.691,3.682 cw(c417.618,9.682) 423.618,13.609 423.618,12.279 ccw(c417.618,9.682) 415.02,3.682
  region net EARTH: 415.836,328.683 ccw(c417.618,322.682) 423.619,320.901 423.618,320.902 423.618,328.682 423.617,328.683
  pour cut-out: 413.691,328.682 ccw(c417.618,322.682) 423.618,318.755 423.618,320.085 cw(c417.618,322.682) 415.02,328.682
  region net EARTH: 76.398,328.683 cw(c74.617,322.682) 68.616,320.901 68.617,320.902 68.617,328.682 68.617,328.683
  region net EARTH: 76.398,3.681 ccw(c74.617,9.682) 68.616,11.463 68.617,11.462 68.617,3.682 68.617,3.681
  pour cut-out: 224.819,68.06 225.298,68.06 225.298,82.992 224.819,82.992
  pour cut-out: 224.819,149.162 225.298,149.162 225.298,164.084 224.819,164.084
  pour cut-out: 224.819,311.367 225.298,311.367 225.298,326.299 224.819,326.299
  pour cut-out: 224.819,230.264 225.298,230.264 225.298,245.364 224.819,245.364
  pour cut-out: 295.148,319.136 295.148,301.727 308.356,301.727 308.356,306.299 298.221,306.299 298.221,319.136 298.221,306.299 298.221,319.136
  pour cut-out: 295.235,238.033 295.235,220.624 308.443,220.624 308.443,225.196 298.308,225.196 298.308,238.033 298.308,225.196 298.308,238.033
  pour cut-out: 295.148,156.931 295.148,139.522 308.356,139.522 308.356,144.094 298.221,144.094 298.221,156.931 298.221,144.094 298.221,156.931
  pour cut-out: 295.148,75.829 295.148,58.42 308.356,58.42 308.356,62.992 298.221,62.992 298.221,75.829 298.221,62.992 298.221,75.829
  pour cut-out: 155.372,273.883 157.513,273.883 157.513,273.476 155.372,273.476
  pour cut-out: 155.372,192.787 157.513,192.787 157.513,192.38 155.372,192.38
  pour cut-out: 155.372,111.678 157.513,111.678 157.513,111.271 155.372,111.271
  pour cut-out: 155.372,30.575 157.513,30.575 157.513,30.169 155.372,30.169
  pour cut-out: 222.467,252.826 222.467,250.002 223.713,250.002 223.713,252.826
  pour cut-out: 222.467,171.724 222.467,168.9 223.713,168.9 223.713,171.724
  pour cut-out: 222.467,90.621 222.467,87.798 223.713,87.798 223.713,90.621
  pour cut-out: 222.467,9.519 222.467,6.695 223.713,6.695 223.713,9.519
  pour cut-out: 154.954,46.776 154.954,37.319 143.586,37.319 143.586,46.776
  pour cut-out: 154.954,127.879 154.954,118.421 143.586,118.421 143.586,127.879
  pour cut-out: 154.954,290.083 154.954,280.626 143.586,280.626 143.586,290.083
  pour cut-out: 154.954,208.981 154.954,199.523 143.586,199.523 143.586,208.981
  pour cut-out: 212.344,58.216 212.344,56.819 212.862,56.819 212.862,58.216
  pour cut-out: 212.344,139.319 212.344,137.922 212.862,137.922 212.862,139.319
  pour cut-out: 212.344,220.421 212.344,219.024 212.862,219.024 212.862,220.421
  pour cut-out: 212.344,301.523 212.344,300.126 212.862,300.126 212.862,301.523
  pour cut-out: 135.788,56.997 135.788,53.162 136.296,53.162 136.296,56.997
  pour cut-out: 166.223,47.81 166.223,50.495 164.411,50.495 164.411,47.81
  pour cut-out: 167.259,54.61 167.259,54.092 166.223,54.092 166.223,54.61
  pour cut-out: 135.788,138.1 135.788,134.264 136.296,134.264 136.296,138.1
  pour cut-out: 166.223,128.912 166.223,131.597 164.411,131.597 164.411,128.912
  pour cut-out: 167.259,135.712 167.259,135.194 166.223,135.194 166.223,135.712
  pour cut-out: 135.788,219.202 135.788,215.366 136.296,215.366 136.296,219.202
  pour cut-out: 166.223,210.015 166.223,212.699 164.411,212.699 164.411,210.015
  pour cut-out: 167.259,216.814 167.259,216.296 166.223,216.296 166.223,216.814
  pour cut-out: 167.259,297.917 167.259,297.399 166.223,297.399 166.223,297.917
  pour cut-out: 166.223,291.117 166.223,293.802 164.411,293.802 164.411,291.117
  pour cut-out: 174.803,265.278 174.803,266.065 171.602,266.065 171.602,265.278
  pour cut-out: 174.803,184.175 174.803,184.963 171.602,184.963 171.602,184.175
  pour cut-out: 174.803,103.073 174.803,103.86 171.602,103.86 171.602,103.073
  pour cut-out: 174.803,21.971 174.803,22.758 171.602,22.758 171.602,21.971
  pour cut-out: 170.586,70.027 170.586,71.45 170.068,71.45 170.068,70.027
  pour cut-out: 164.89,70.221 164.89,71.643 164.372,71.643 164.372,70.221
  pour cut-out: 170.586,151.13 170.586,152.552 170.068,152.552 170.068,151.13
  pour cut-out: 164.89,151.323 164.89,152.745 164.372,152.745 164.372,151.323
  pour cut-out: 170.586,232.232 170.586,233.654 170.068,233.654 170.068,232.232
  pour cut-out: 164.89,232.425 164.89,233.848 164.372,233.848 164.372,232.425
  pour cut-out: 164.89,313.528 164.89,314.95 164.372,314.95 164.372,313.528
  pour cut-out: 170.586,313.334 170.586,314.757 170.068,314.757 170.068,313.334
  pour cut-out: 229.921,203.87 229.921,196.357 235.623,196.357 235.623,203.87
  pour cut-out: 135.908,56.997 135.908,53.162 136.296,53.162 136.296,56.997
  pour cut-out: 135.908,219.202 135.908,215.366 136.296,215.366 136.296,219.202
  pour cut-out: 135.788,300.304 135.788,296.469 136.296,296.469 136.296,300.304
  pour cut-out: 135.908,138.1 135.908,134.264 136.296,134.264 136.296,138.1
  pour cut-out: 93.235,241.343 93.235,239.58 89.857,239.58 89.857,240.85 91.627,240.85 91.627,241.343
  pour cut-out: 93.235,242.135 93.235,245.074 89.857,245.074 89.857,242.628 91.627,242.628 91.627,242.135
  pour cut-out: 93.235,160.24 93.235,158.477 89.857,158.477 89.857,159.747 91.627,159.747 91.627,160.24
  pour cut-out: 93.235,161.032 93.235,163.972 89.857,163.972 89.857,161.525 91.627,161.525 91.627,161.032
  pour cut-out: 93.235,322.445 93.235,320.682 89.857,320.682 89.857,321.952 91.627,321.952 91.627,322.445
  pour cut-out: 93.235,323.237 93.235,326.176 89.857,326.176 89.857,323.73 91.627,323.73 91.627,323.237
  pour cut-out: 93.235,79.93 93.235,82.869 89.857,82.869 89.857,80.423 91.627,80.423 91.627,79.93
  pour cut-out: 93.235,79.138 93.235,77.375 89.857,77.375 89.857,78.645 91.627,78.645 91.627,79.138
  pour cut-out: 93.179,124.452 93.179,122.689 89.802,122.689 89.802,123.959 91.571,123.959 91.571,124.452
  pour cut-out: 93.177,43.335 93.177,41.572 89.8,41.572 89.8,42.842 91.569,42.842 91.569,43.335
  pour cut-out: 93.179,205.554 93.179,203.791 89.802,203.791 89.802,205.061 91.571,205.061 91.571,205.554
  pour cut-out: 93.179,286.656 93.179,284.893 89.802,284.893 89.802,286.163 91.571,286.163 91.571,286.656
  pour cut-out: 142.57,72.263 152.451,72.263 152.451,63.525 142.57,63.525
  pour cut-out: 142.57,153.365 152.451,153.365 152.451,144.627 142.57,144.627
  pour cut-out: 142.57,234.467 152.451,234.467 152.451,225.73 142.57,225.73
  pour cut-out: 142.57,315.57 152.451,315.57 152.451,306.832 142.57,306.832
  pour cut-out: 415.976,186.982 420.954,186.982 420.954,176.746 415.976,176.746
Layer 1:
  pour cut-out: 399.303,320.041 408.396,320.041 408.396,316.586 399.303,316.586
  pour cut-out: 380.381,295.723 380.381,307.391 389.052,307.391 389.052,295.723
  pour cut-out: 393.676,295.097 393.676,308.542 405.917,308.542 405.917,295.097
  pour cut-out: 361.618,294.005 361.618,309.067 365.506,309.067 365.506,294.005
  pour cut-out: 371.248,293.726 371.248,310.305 375.136,310.305 375.136,293.726
  pour cut-out: 366.573,313.055 369.392,313.055 369.392,310.617 366.573,310.617
  pour cut-out: 399.811,313.055 402.63,313.055 402.63,310.617 399.811,310.617
  pour cut-out: 399.811,292.188 402.63,292.188 402.63,289.75 399.811,289.75
  pour cut-out: 366.573,292.188 369.392,292.188 369.392,289.75 366.573,289.75
  pour cut-out: 366.66,211.085 369.479,211.085 369.479,208.647 366.66,208.647
  pour cut-out: 399.898,211.085 402.717,211.085 402.717,208.647 399.898,208.647
  pour cut-out: 399.898,231.952 402.717,231.952 402.717,229.514 399.898,229.514
  pour cut-out: 366.573,130.887 369.392,130.887 369.392,128.448 366.573,128.448
  pour cut-out: 399.811,130.887 402.63,130.887 402.63,128.448 399.811,128.448
  pour cut-out: 399.811,151.753 402.63,151.753 402.63,149.315 399.811,149.315
  pour cut-out: 399.811,70.651 402.63,70.651 402.63,68.213 399.811,68.213
  pour cut-out: 399.811,49.784 402.63,49.784 402.63,47.346 399.811,47.346
  pour cut-out: 366.573,49.784 369.392,49.784 369.392,47.346 366.573,47.346
  pour cut-out: 161.827,25.418 167.916,25.418 167.916,19.88 161.827,19.88
  pour cut-out: 161.827,268.725 167.916,268.725 167.916,263.187 161.827,263.187
  pour cut-out: 161.827,187.622 167.916,187.622 167.916,182.085 161.827,182.085
  pour cut-out: 161.827,106.52 167.916,106.52 167.916,100.983 161.827,100.983
  pour cut-out: 399.303,77.637 408.396,77.637 408.396,74.182 399.303,74.182
  pour cut-out: 380.381,53.319 380.381,64.987 389.052,64.987 389.052,53.319
  pour cut-out: 393.676,52.693 393.676,66.138 405.917,66.138 405.917,52.693
  pour cut-out: 361.618,51.601 361.618,66.663 365.506,66.663 365.506,51.601
  pour cut-out: 371.248,51.322 371.248,67.901 375.136,67.901 375.136,51.322
  pour cut-out: 366.573,70.651 369.392,70.651 369.392,68.213 366.573,68.213
  pour cut-out: 399.303,158.739 408.396,158.739 408.396,155.285 399.303,155.285
  pour cut-out: 380.381,134.422 380.381,146.089 389.052,146.089 389.052,134.422
  pour cut-out: 393.676,133.796 393.676,147.24 405.917,147.24 405.917,133.796
  pour cut-out: 361.618,132.703 361.618,147.766 365.506,147.766 365.506,132.703
  pour cut-out: 371.248,132.424 371.248,149.003 375.136,149.003 375.136,132.424
  pour cut-out: 366.573,151.753 369.392,151.753 369.392,149.315 366.573,149.315
  pour cut-out: 399.39,238.938 408.483,238.938 408.483,235.483 399.39,235.483
  pour cut-out: 380.468,214.62 380.468,226.288 389.139,226.288 389.139,214.62
  pour cut-out: 393.763,213.994 393.763,227.439 406.004,227.439 406.004,213.994
  pour cut-out: 361.705,212.902 361.705,227.964 365.593,227.964 365.593,212.902
  pour cut-out: 371.335,212.623 371.335,229.202 375.223,229.202 375.223,212.623
  pour cut-out: 366.66,231.952 369.479,231.952 369.479,229.514 366.66,229.514